# Altium PCB ZYNQ_BOARD.PcbDoc (part 3 of 9)
Units mm, origin at the board's own origin, x right, y up, seen from the top; angles counter-clockwise.
Board outline 120 x 66 mm, 10 copper layers (Top Layer, Internal Plane 1 (GND), Middle Layer 1, Middle Layer 2, Internal Plane 2 (+1.0V), Middle Layer 3, Middle Layer 4, Middle Layer 5 (PWR), Internal Plane 3 (GND), Bottom Layer), stack 0.982 mm thick; 333 components, 331 nets, 1511 pads, 1077 vias.
Unrouted connection lines stored in the file: 30.
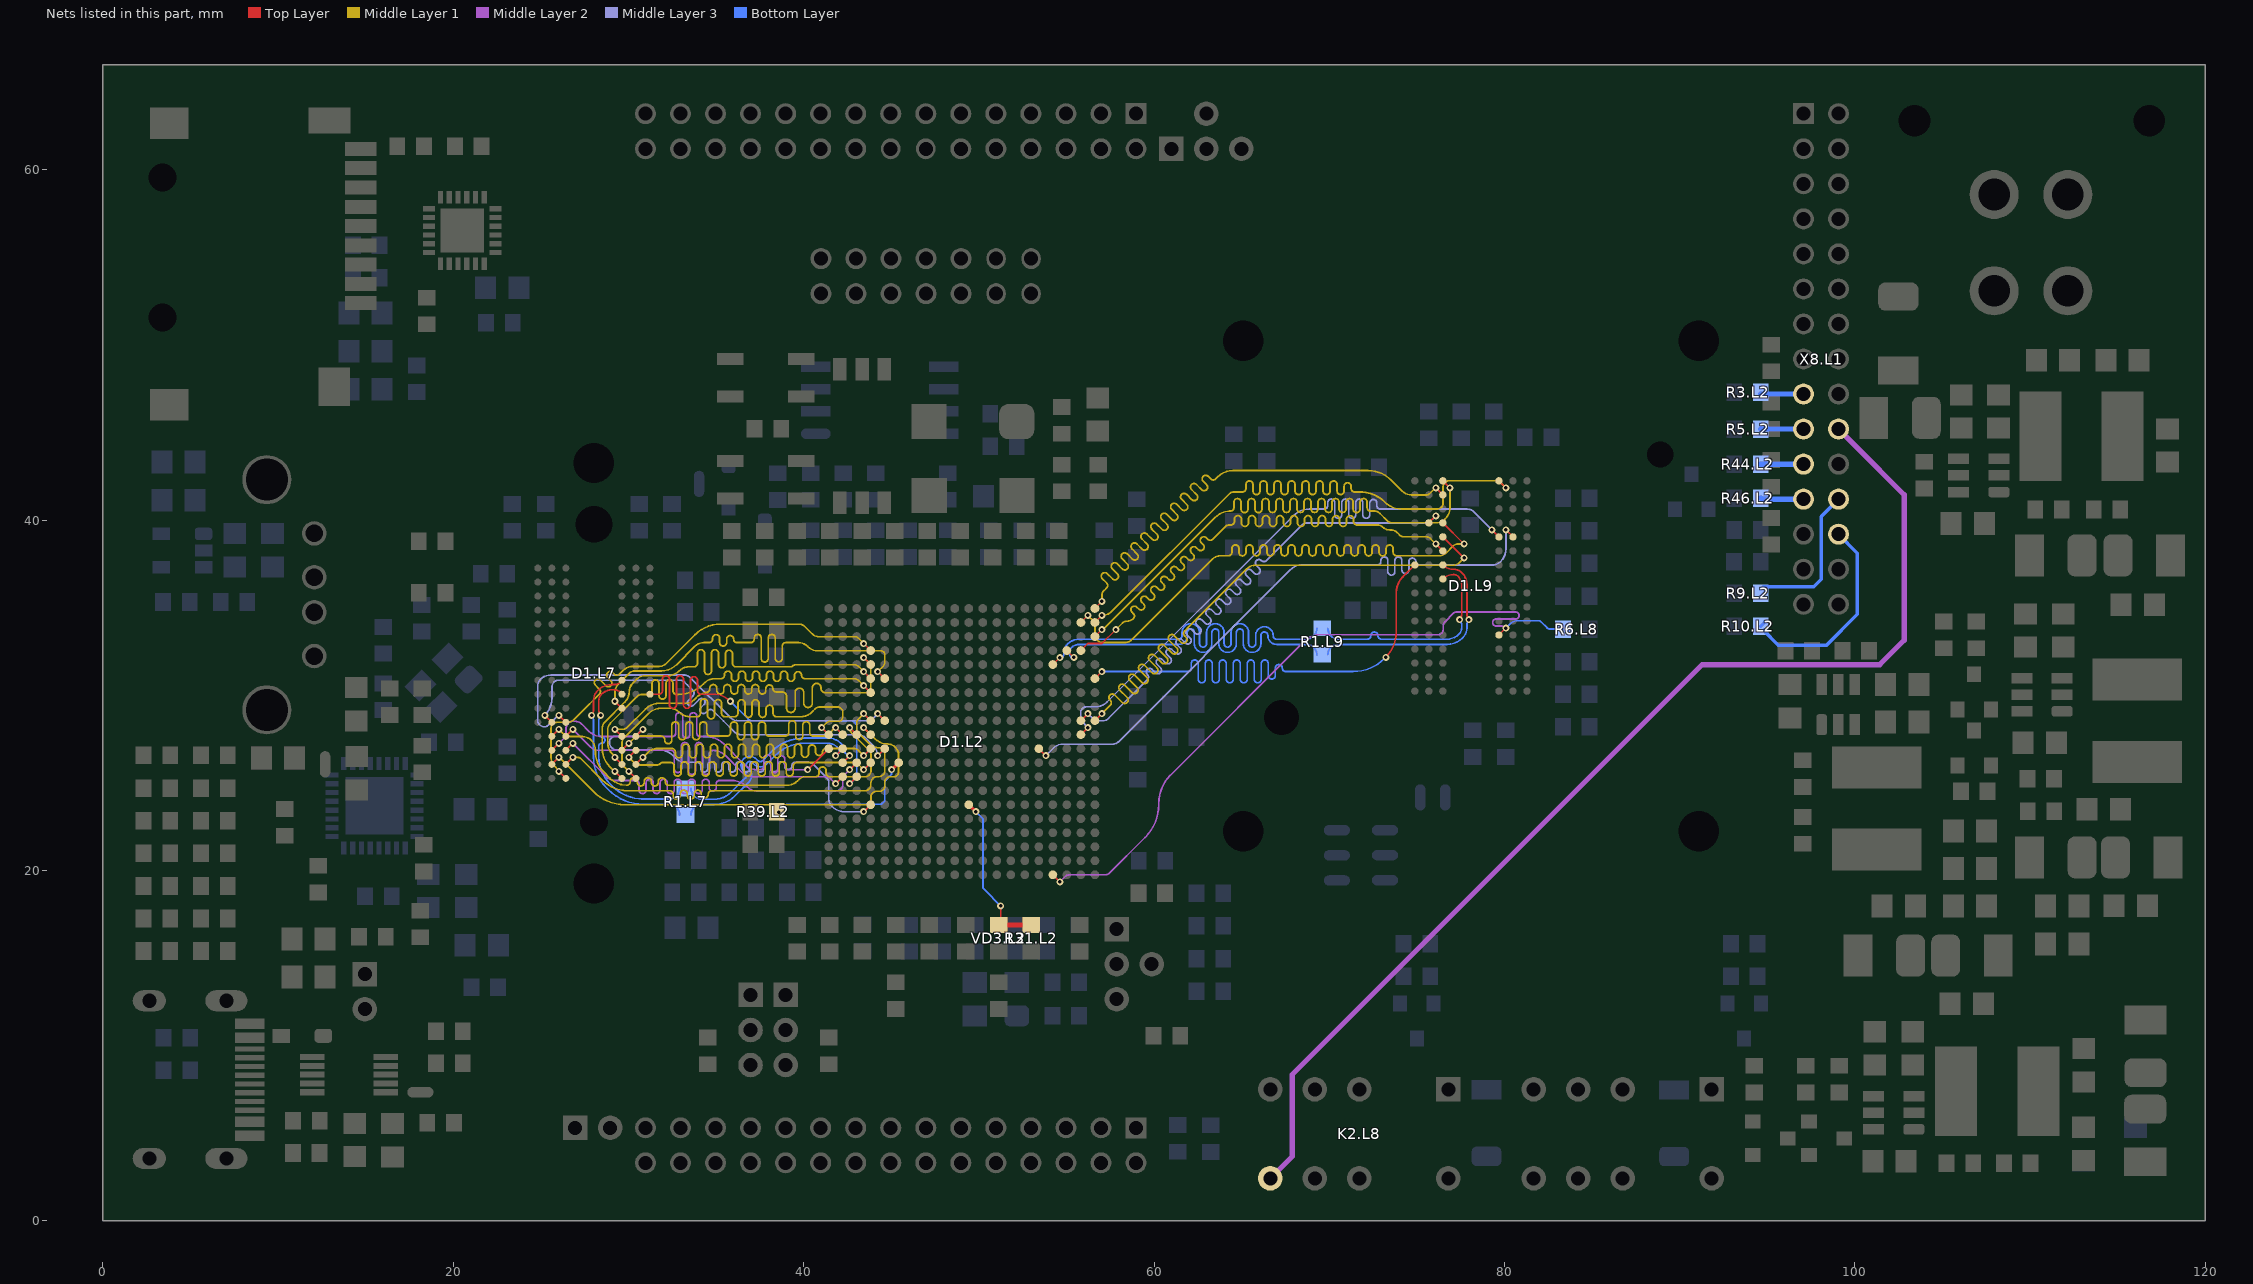
[diagram p11: the nets of this part, all layers, seen from the top]

## Via types
v1: diameter 0.4, hole 0.2, Top Layer to Bottom Layer, 1059 vias
v2: diameter 0.9, hole 0.6, Top Layer to Bottom Layer, 18 vias

## Nets (pads, with @x,y where several pads share a name; then routed paths per layer and width w, separated by ;. In a path a pad name is that pad's centre, name@x,y a point inside that pad or via, vN(x,y) a via of type N, cw(c..) or ccw(c..) an arc to the next point about the centre after c; other vN are vias at no path point) (continued)
A10: D1.L2.D19 D1.L9.L7 | length 38
  Top Layer w0.1: D1.L2.D19@55.82,32.56 56.22,32.96 57.02,32.96 v1(57.82,33.76) ; v1(76.08,38.645) D1.L9.L7@76.48,38.245
  Middle Layer 1 w0.1: v1(57.82,33.76) 58.193,34.133 cw(c58.445,33.881) 58.445,34.237 58.464,34.237 ccw(c58.464,34.727) 58.78,34.353 ccw(c58.464,34.727) 58.811,34.381 58.817,34.387 ccw(c58.675,34.528) 58.817,34.67 58.734,34.752 cw(c58.876,34.894) 58.734,35.035 cw(c58.876,34.894) 59.017,35.035 59.122,34.931 ccw(c59.263,35.072) 59.404,34.931 ccw(c59.263,35.072) 59.404,35.214 59.3,35.318 cw(c59.441,35.459) 59.3,35.601 cw(c59.441,35.459) 59.583,35.601 59.687,35.496 ccw(c59.829,35.638) 59.97,35.496 ccw(c59.829,35.638) 59.97,35.779 59.866,35.884 cw(c60.007,36.025) 59.866,36.167 cw(c60.007,36.025) 60.149,36.167 60.253,36.062 ccw(c60.394,36.204) 60.536,36.062 ccw(c60.394,36.204) 60.536,36.345 60.431,36.449 cw(c60.573,36.591) 60.431,36.732 cw(c60.573,36.591) 60.714,36.732 60.819,36.628 ccw(c60.96,36.769) 61.101,36.628 ccw(c60.96,36.769) 61.101,36.911 60.997,37.015 cw(c61.139,37.156) 60.997,37.298 cw(c61.139,37.156) 61.28,37.298 61.384,37.194 ccw(c61.526,37.335) 61.667,37.194 ccw(c61.526,37.335) 61.667,37.476 61.563,37.581 cw(c61.704,37.722) 61.563,37.864 cw(c61.704,37.722) 61.846,37.864 61.95,37.759 ccw(c62.091,37.901) 62.233,37.759 ccw(c62.091,37.901) 62.233,38.042 62.128,38.146 cw(c62.27,38.288) 62.128,38.429 cw(c62.27,38.288) 62.411,38.429 62.516,38.325 ccw(c62.657,38.466) 62.799,38.325 ccw(c62.657,38.466) 62.799,38.608 62.694,38.712 cw(c62.836,38.854) 62.694,38.995 cw(c62.836,38.854) 62.977,38.995 63.059,38.913 ccw(c63.201,39.054) 63.342,38.913 63.825,39.395 64.078,39.649 cw(c64.275,39.452) 64.188,39.716 cw(c64.275,39.452) 64.275,39.73 64.332,39.73 64.382,39.73 ccw(c64.382,39.93) 64.582,39.93 64.582,40.063 cw(c64.782,40.063) 64.982,40.063 64.982,39.844 ccw(c65.182,39.844) 65.382,39.844 65.382,40.063 cw(c65.582,40.063) 65.782,40.063 65.782,39.844 ccw(c65.982,39.844) 66.182,39.844 66.182,40.063 cw(c66.382,40.063) 66.582,40.063 66.582,39.844 ccw(c66.782,39.844) 66.982,39.844 66.982,40.063 cw(c67.182,40.063) 67.382,40.063 67.382,39.844 ccw(c67.582,39.844) 67.782,39.844 67.782,40.063 cw(c67.982,40.063) 68.182,40.063 68.182,39.844 ccw(c68.382,39.844) 68.582,39.844 68.582,40.063 cw(c68.782,40.063) 68.982,40.063 68.982,39.844 ccw(c69.182,39.844) 69.382,39.844 69.382,40.063 cw(c69.582,40.063) 69.782,40.063 69.782,39.844 ccw(c69.982,39.844) 70.182,39.844 70.182,40.063 cw(c70.382,40.063) 70.582,40.063 70.582,39.844 ccw(c70.782,39.844) 70.982,39.844 70.982,40.059 cw(c71.182,40.059) 71.382,40.059 71.382,39.93 ccw(c71.582,39.93) 71.582,39.73 72.123,39.73 72.753,39.73 cw(c72.753,39.324) 73.04,39.611 ccw(c73.441,40.012) 73.441,39.445 73.508,39.445 cw(c73.508,38.938) 73.866,39.296 74.004,39.159 ccw(c74.265,39.421) 74.265,39.051 75.535,39.051 cw(c75.535,38.719) 75.77,38.953 v1(76.08,38.645) v1(76.08,38.645) v1@76.117,38.682
A11: D1.L2.A20 D1.L9.R7 | length 37.9
  Top Layer w0.1: D1.L2.A20@56.62,34.96 v1(57.02,35.36) ; v1(76.08,41.845) D1.L9.R7@76.48,41.445
  Middle Layer 1 w0.1: v1(57.02,35.36) 57.02,35.742 cw(c57.308,35.742) 57.104,35.946 57.255,36.097 57.29,36.132 ccw(c57.149,36.273) 57.29,36.415 57.042,36.663 cw(c57.183,36.805) 57.042,36.946 cw(c57.183,36.805) 57.325,36.946 57.62,36.651 ccw(c57.761,36.792) 57.903,36.651 ccw(c57.761,36.792) 57.903,36.934 57.608,37.229 cw(c57.749,37.37) 57.608,37.512 cw(c57.749,37.37) 57.891,37.512 58.186,37.216 ccw(c58.327,37.358) 58.469,37.216 ccw(c58.327,37.358) 58.469,37.499 58.173,37.794 cw(c58.315,37.936) 58.173,38.077 cw(c58.315,37.936) 58.456,38.077 58.751,37.782 ccw(c58.893,37.923) 59.034,37.782 ccw(c58.893,37.923) 59.034,38.065 58.739,38.36 cw(c58.88,38.502) 58.739,38.643 cw(c58.88,38.502) 59.022,38.643 59.317,38.348 ccw(c59.459,38.489) 59.6,38.348 ccw(c59.459,38.489) 59.6,38.631 59.305,38.926 cw(c59.446,39.067) 59.305,39.209 cw(c59.446,39.067) 59.588,39.209 59.883,38.913 ccw(c60.024,39.055) 60.166,38.913 ccw(c60.024,39.055) 60.166,39.196 59.87,39.492 cw(c60.012,39.633) 59.87,39.774 cw(c60.012,39.633) 60.153,39.774 60.449,39.479 ccw(c60.59,39.621) 60.731,39.479 ccw(c60.59,39.621) 60.731,39.762 60.436,40.057 cw(c60.578,40.199) 60.436,40.34 cw(c60.578,40.199) 60.719,40.34 61.014,40.045 ccw(c61.156,40.186) 61.297,40.045 ccw(c61.156,40.186) 61.297,40.328 61.002,40.623 cw(c61.143,40.764) 61.002,40.906 cw(c61.143,40.764) 61.285,40.906 61.58,40.61 ccw(c61.721,40.752) 61.863,40.61 ccw(c61.721,40.752) 61.863,40.893 61.567,41.189 cw(c61.709,41.33) 61.567,41.471 cw(c61.709,41.33) 61.85,41.471 62.146,41.176 ccw(c62.287,41.318) 62.428,41.176 ccw(c62.287,41.318) 62.428,41.459 62.133,41.754 cw(c62.275,41.896) 62.133,42.037 cw(c62.275,41.896) 62.416,42.037 62.711,41.742 ccw(c62.853,41.883) 62.994,41.742 ccw(c62.853,41.883) 62.994,42.025 62.801,42.218 cw(c62.942,42.359) 62.801,42.501 cw(c62.942,42.359) 63.084,42.501 63.23,42.354 ccw(c63.371,42.496) 63.513,42.354 63.633,42.475 63.75,42.577 cw(c64.491,41.616) 63.79,42.607 cw(c64.491,41.616) 64.491,42.83 72.223,42.83 ; 72.224,42.83 cw(c72.224,40.981) 73.531,42.289 73.532,42.288 74.171,41.649 ; 74.171,41.649 ccw(c74.679,42.157) 74.679,41.439 75.537,41.439 ccw(c75.537,41.698) 75.72,41.515 76.029,41.824 cw(c76.08,41.773) v1(76.08,41.845)
A12: D1.L2.B19 D1.L9.N7 | length 37.9
  Top Layer w0.1: D1.L2.B19@55.82,34.16 v1(56.22,34.56) ; D1.L9.N7@76.48,39.845 v1@77.685,38.64
  Middle Layer 1 w0.1: v1(56.22,34.56) 56.543,34.237 cw(c56.338,34.033) 56.627,34.033 56.627,33.697 ; 56.627,33.696 56.627,33.397 ccw(c56.947,33.397) 56.721,33.171 ccw(c57.103,33.554) 57.103,33.013 58.298,33.013 ccw(c58.298,33.652) 58.75,33.2 63.346,37.796 cw(c63.761,37.382) 63.761,37.968 64.19,37.968 64.24,37.968 ccw(c64.24,38.168) 64.44,38.168 64.44,38.385 cw(c64.64,38.385) 64.84,38.385 64.84,38.162 ccw(c65.04,38.162) 65.24,38.162 65.24,38.385 cw(c65.44,38.385) 65.64,38.385 65.64,38.162 ccw(c65.84,38.162) 66.04,38.162 66.04,38.385 cw(c66.24,38.385) 66.44,38.385 66.44,38.162 ccw(c66.64,38.162) 66.84,38.162 66.84,38.385 cw(c67.04,38.385) 67.24,38.385 67.24,38.162 ccw(c67.44,38.162) 67.64,38.162 67.64,38.385 cw(c67.84,38.385) 68.04,38.385 68.04,38.162 ccw(c68.24,38.162) 68.44,38.162 68.44,38.385 cw(c68.64,38.385) 68.84,38.385 68.84,38.162 ccw(c69.04,38.162) 69.24,38.162 69.24,38.385 cw(c69.44,38.385) 69.64,38.385 69.64,38.162 ccw(c69.84,38.162) 70.04,38.162 70.04,38.385 cw(c70.24,38.385) 70.44,38.385 70.44,38.162 ccw(c70.64,38.162) 70.84,38.162 70.84,38.385 cw(c71.04,38.385) 71.24,38.385 71.24,38.162 ccw(c71.44,38.162) 71.64,38.162 71.64,38.385 cw(c71.84,38.385) 72.04,38.385 72.04,38.162 ccw(c72.24,38.162) 72.44,38.162 72.44,38.385 cw(c72.64,38.385) 72.84,38.385 72.84,38.162 ccw(c73.04,38.162) 73.24,38.162 73.24,38.385 cw(c73.44,38.385) 73.64,38.385 73.64,38.168 ccw(c73.84,38.168) 73.84,37.968 75.199,37.968 76.282,37.968 ccw(c76.282,38.499) 76.658,38.124 77.065,38.531 cw(c77.34,38.256) 77.34,38.645 v1(77.69,38.645)
A13: D1.L2.B20 D1.L9.T3 | length 37.9
  Top Layer w0.1: D1.L2.B20@56.62,34.16 v1(57.02,34.56) ; D1.L9.T3@79.68,42.245 v1(80.08,41.845)
  Middle Layer 1 w0.1: v1(57.02,34.56) ccw(c57.02,35.354) 57.582,34.793 64.304,41.515 cw(c64.532,41.286) 64.532,41.609 64.992,41.609 65.042,41.609 ccw(c65.042,41.809) 65.242,41.809 65.242,42.037 cw(c65.442,42.037) 65.642,42.037 65.642,41.664 ccw(c65.842,41.664) 66.042,41.664 66.042,42.037 cw(c66.242,42.037) 66.442,42.037 66.442,41.664 ccw(c66.642,41.664) 66.842,41.664 66.842,42.037 cw(c67.042,42.037) 67.242,42.037 67.242,41.664 ccw(c67.442,41.664) 67.642,41.664 67.642,42.037 cw(c67.842,42.037) 68.042,42.037 68.042,41.664 ccw(c68.242,41.664) 68.442,41.664 68.442,42.037 cw(c68.642,42.037) 68.842,42.037 68.842,41.664 ccw(c69.042,41.664) 69.242,41.664 69.242,42.037 cw(c69.442,42.037) 69.642,42.037 69.642,41.664 ccw(c69.842,41.664) 70.042,41.664 70.042,42.037 cw(c70.242,42.037) 70.442,42.037 70.442,41.664 ccw(c70.642,41.664) 70.842,41.664 70.842,41.935 cw(c71.042,41.935) 71.242,41.935 71.242,41.809 ccw(c71.442,41.809) 71.442,41.609 71.757,41.609 71.84,41.608 cw(c71.757,39.597) 71.89,41.605 cw(c71.757,39.597) 72.099,41.58 cw(c71.757,39.597) 73.18,41.02 ccw(c74.097,41.937) 74.097,40.64 76.163,40.64 ccw(c76.163,40.985) 76.406,40.741 ccw(c76.206,40.941) 76.489,40.941 76.489,41.882 cw(c76.868,41.882) 76.6,42.15 cw(c76.841,41.909) 76.841,42.25 79.448,42.25 cw(c79.448,41.702) 79.836,42.089 v1(80.08,41.845)
A14: D1.L2.C20 D1.L9.T7 | length 38
  Top Layer w0.1: D1.L2.C20@56.62,33.36 v1(57.02,33.76) ; D1.L9.T7@76.48,42.245 v1(76.88,41.845)
  Middle Layer 1 w0.1: v1@57.02,33.7 63.468,40.148 cw(c64.37,39.246) 64.199,40.51 cw(c64.37,39.246) 64.305,40.52 cw(c64.37,39.246) 64.355,40.522 ; v1(57.02,33.76) v1@57.079,33.76 ; 64.356,40.522 ccw(c64.355,40.722) 64.555,40.722 64.555,41.034 cw(c64.755,41.034) 64.955,41.034 64.955,40.631 ccw(c65.155,40.631) 65.355,40.631 65.355,41.034 cw(c65.555,41.034) 65.755,41.034 65.755,40.636 ccw(c65.955,40.636) 66.155,40.636 66.155,41.034 cw(c66.355,41.034) 66.555,41.034 66.555,40.641 ccw(c66.755,40.641) 66.955,40.641 66.955,41.034 cw(c67.155,41.034) 67.355,41.034 67.355,40.641 ccw(c67.555,40.641) 67.755,40.641 67.755,41.034 cw(c67.955,41.034) 68.155,41.034 68.155,40.641 ccw(c68.355,40.641) 68.555,40.641 68.555,41.034 cw(c68.755,41.034) 68.955,41.034 68.955,40.641 ccw(c69.155,40.641) 69.355,40.641 69.355,41.034 cw(c69.555,41.034) 69.755,41.034 69.755,40.641 ccw(c69.955,40.641) 70.155,40.641 70.155,41.034 cw(c70.355,41.034) 70.555,41.034 70.555,40.641 ccw(c70.755,40.641) 70.955,40.641 70.955,41.034 cw(c71.155,41.034) 71.355,41.034 71.355,40.638 ccw(c71.555,40.638) 71.755,40.638 71.755,41.034 cw(c71.955,41.034) 72.155,41.034 72.155,40.722 ccw(c72.355,40.722) 72.355,40.522 72.557,40.522 72.578,40.521 cw(c72.557,40.048) 72.622,40.517 cw(c72.557,40.048) 72.628,40.516 cw(c72.557,40.048) 72.64,40.514 cw(c72.557,40.048) 72.892,40.383 72.893,40.382 73.314,39.961 ccw(c73.582,40.229) 73.582,39.85 76.08,39.85 ccw(c76.08,40.595) 76.607,40.068 76.63,40.091 ccw(c76.026,40.695) 76.88,40.695 v1(76.88,41.845)
A15: D1.L2.J20 D1.L9.M7 | length 38
  Top Layer w0.1: D1.L2.J20@56.62,28.56 v1(57.02,28.96) ; D1.L9.M7@76.48,39.045 v1@77.723,37.803
  Middle Layer 1 w0.1: v1(57.02,28.96) 57.458,29.398 57.494,29.434 ccw(c57.352,29.575) 57.494,29.717 57.472,29.738 cw(c57.614,29.879) 57.472,30.021 cw(c57.614,29.879) 57.755,30.021 58.181,29.595 ccw(c58.323,29.736) 58.464,29.595 ccw(c58.323,29.736) 58.464,29.877 58.038,30.303 cw(c58.18,30.445) 58.038,30.586 cw(c58.18,30.445) 58.321,30.586 58.747,30.16 ccw(c58.888,30.302) 59.03,30.16 ccw(c58.888,30.302) 59.03,30.443 58.604,30.869 cw(c58.745,31.011) 58.604,31.152 cw(c58.745,31.011) 58.887,31.152 59.313,30.726 ccw(c59.454,30.867) 59.596,30.726 ccw(c59.454,30.867) 59.596,31.009 59.17,31.435 cw(c59.311,31.576) 59.17,31.718 cw(c59.311,31.576) 59.452,31.718 59.878,31.292 ccw(c60.02,31.433) 60.161,31.292 ccw(c60.02,31.433) 60.161,31.574 59.735,32 cw(c59.877,32.142) 59.735,32.283 cw(c59.877,32.142) 60.018,32.283 60.444,31.857 ccw(c60.585,31.999) 60.727,31.857 ccw(c60.585,31.999) 60.727,32.14 60.301,32.566 cw(c60.442,32.708) 60.301,32.849 cw(c60.442,32.708) 60.584,32.849 61.01,32.423 ccw(c61.151,32.564) 61.293,32.423 ccw(c61.151,32.564) 61.293,32.706 60.867,33.132 cw(c61.008,33.273) 60.867,33.415 cw(c61.008,33.273) 61.149,33.415 61.534,33.03 ccw(c61.676,33.171) 61.817,33.03 ccw(c61.676,33.171) 61.817,33.313 61.736,33.393 cw(c61.878,33.535) 61.736,33.676 62,33.94 65.283,37.223 cw(c65.78,36.727) 65.78,37.429 77.072,37.429 ccw(c77.072,37.918) 77.417,37.572 v1(77.69,37.845)
ADDR0: D1.L2.N2 D1.L7.N3 | length 26.2
  Top Layer w0.1: D1.L7.N3@26.42,27.665 v1(26.82,28.065) ; v1(41.82,24.96) D1.L2.N2@42.22,25.36
  Middle Layer 1 w0.1: v1(26.82,28.065) v1@26.881,28.065
  Middle Layer 2 w0.1: v1(26.82,28.065) 27.838,27.047 27.839,27.046 ccw(c28.279,27.487) 28.279,26.864 ; 28.28,26.864 32.08,26.864 32.415,26.864 cw(c32.415,26.664) 32.615,26.664 32.615,25.793 ccw(c32.815,25.793) 33.015,25.793 33.015,27.108 cw(c33.215,27.108) 33.415,27.108 33.415,25.683 ccw(c33.615,25.683) 33.815,25.683 33.815,27.108 cw(c34.015,27.108) 34.215,27.108 34.215,25.683 ccw(c34.415,25.683) 34.615,25.683 34.615,26.662 cw(c34.815,26.662) 34.827,26.862 34.915,26.856 cw(c34.789,25.803) 34.922,26.855 cw(c34.789,25.803) 34.965,26.849 cw(c34.789,25.803) 35.539,26.553 35.54,26.552 36.476,25.616 ccw(c37.119,26.259) 37.119,25.35 41.251,25.35 cw(c41.251,24.917) 41.557,25.223 v1(41.82,24.96)
ADDR1: D1.L2.K2 D1.L7.P7 | length 26.4
  Top Layer w0.1: D1.L7.P7@29.62,26.865 v1(30.02,27.265) ; v1(41.82,28.16) D1.L2.K2@42.22,27.76
  Middle Layer 1 w0.1: v1(30.02,27.265) 30.266,27.511 cw(c30.665,27.114) 30.665,27.677 31.415,27.677 31.865,27.677 cw(c31.865,27.477) 32.065,27.477 32.065,27.443 ccw(c32.265,27.443) 32.465,27.443 32.465,28.287 cw(c32.665,28.287) 32.865,28.287 32.865,27.67 ccw(c33.065,27.67) 33.265,27.67 33.265,28.287 cw(c33.465,28.287) 33.665,28.287 33.665,27.67 ccw(c33.865,27.67) 34.065,27.67 34.065,28.287 cw(c34.265,28.287) 34.465,28.287 34.465,27.877 ccw(c34.665,27.877) 34.665,27.677 34.932,27.677 35.568,27.677 35.618,27.677 ccw(c35.618,27.877) 35.818,27.877 35.818,28.287 cw(c36.018,28.287) 36.218,28.287 36.218,27.663 ccw(c36.418,27.663) 36.618,27.663 36.618,28.287 cw(c36.818,28.287) 37.018,28.287 37.018,27.663 ccw(c37.218,27.663) 37.418,27.663 37.418,28.287 cw(c37.618,28.287) 37.818,28.287 37.818,27.877 ccw(c38.018,27.877) 38.018,27.677 38.47,27.677 38.891,27.677 38.941,27.677 ccw(c38.941,27.877) 39.141,27.877 39.141,28.357 cw(c39.341,28.357) 39.541,28.357 39.541,27.672 ccw(c39.741,27.672) 39.941,27.672 39.941,28.301 cw(c40.141,28.301) 40.341,28.301 40.341,27.877 ccw(c40.541,27.877) 40.541,27.677 40.848,27.677 41.111,27.677 ccw(c41.111,28.161) 41.453,27.819 41.776,28.142 cw(c41.82,28.097) v1(41.82,28.16)
ADDR2: D1.L2.M3 D1.L7.P3 | length 26.2
  Top Layer w0.1: D1.L7.P3@26.42,26.865 v1(26.82,27.265) ; v1(42.62,25.76) D1.L2.M3@43.02,26.16
  Middle Layer 1 w0.1: v1(26.82,27.265) v1@26.893,27.265
  Middle Layer 2 w0.1: v1(26.82,27.265) 28.739,25.346 ccw(c29.22,25.827) 29.22,25.147 29.952,25.147 30.002,25.147 30.402,25.147 cw(c30.402,24.947) 30.602,24.947 30.602,24.595 ccw(c30.802,24.595) 31.002,24.595 31.002,25.013 cw(c31.202,25.013) 31.402,25.013 31.402,24.595 ccw(c31.602,24.595) 31.802,24.595 31.802,25.013 cw(c32.002,25.013) 32.202,25.013 32.202,24.595 ccw(c32.402,24.595) 32.602,24.595 32.602,25.013 cw(c32.802,25.013) 33.002,25.013 33.002,24.595 ccw(c33.202,24.595) 33.402,24.595 33.402,25.013 cw(c33.602,25.013) 33.802,25.013 33.802,24.595 ccw(c34.002,24.595) 34.202,24.595 34.202,25.013 cw(c34.402,25.013) 34.602,25.013 34.602,24.731 ccw(c34.802,24.731) 35.002,24.731 35.002,24.947 cw(c35.202,24.947) 35.202,25.147 35.545,25.147 35.595,25.147 35.857,25.147 cw(c35.857,23.817) 36.025,25.136 cw(c35.857,23.817) 36.797,24.758 cw(c35.857,23.817) 36.798,24.757 ccw(c37.303,25.263) 37.303,24.548 ; 37.304,24.548 41.858,24.548 ccw(c41.858,24.945) 42.138,24.663 ccw(c41.929,24.875) 42.226,24.875 42.226,25.147 cw(c42.757,25.147) 42.382,25.522 v1(42.62,25.76)
ADDR3: D1.L2.K3 D1.L7.N2 | length 26.4
  Top Layer w0.1: D1.L7.N2@25.62,27.665 v1(26.02,28.065) ; v1(42.62,28.16) D1.L2.K3@43.02,27.76
  Middle Layer 1 w0.1: v1(26.02,28.065) 26.269,27.816 ccw(c26.67,28.217) 26.67,27.65 27.366,27.65 cw(c27.366,26.942) 27.867,27.443 cw(c27.275,26.851) 28.112,26.851 28.112,26.694 ccw(c29.717,26.77) 28.581,25.633 28.935,25.28 ccw(c29.936,26.281) 29.546,24.92 ccw(c29.936,26.281) 29.596,24.906 29.873,24.873 ccw(c29.898,25.071) 30.098,25.071 30.098,25.095 cw(c30.298,25.095) 30.498,25.095 30.498,25.031 ccw(c30.698,25.031) 30.898,25.031 30.898,25.095 cw(c31.098,25.095) 31.298,25.095 31.298,25.031 ccw(c31.498,25.031) 31.698,25.031 31.698,25.095 cw(c31.898,25.095) 32.098,25.095 32.098,25.065 ccw(c32.298,25.065) 32.298,24.865 32.748,24.865 39.039,24.865 ccw(c39.039,25.723) 39.645,25.116 39.746,25.217 cw(c40.083,24.881) 40.083,25.357 40.625,25.357 40.675,25.357 ccw(c40.675,25.557) 40.875,25.557 40.875,25.716 cw(c41.075,25.716) 41.275,25.716 41.275,25.557 ccw(c41.475,25.557) 41.475,25.357 42.171,25.357 43.496,25.357 ccw(c43.496,25.69) 43.73,25.453 ccw(c43.465,25.72) 43.841,25.72 43.841,26.625 ccw(c43.53,26.625) 43.75,26.845 42.751,27.844 cw(c43.067,28.16) v1(42.62,28.16)
ADDR4: D1.L2.M4 D1.L7.P8 | length 26.4
  Top Layer w0.1: v1(30.02,26.465) D1.L7.P8@30.42,26.865 ; v1(43.42,25.76) D1.L2.M4@43.82,26.16
  Middle Layer 1 w0.1: v1(30.02,26.465) 30.381,26.104 ccw(c30.565,26.288) 30.565,26.028 31.62,26.028 ccw(c31.62,26.287) 31.803,26.104 cw(c31.963,25.944) 31.95,26.169 cw(c31.963,25.944) 31.963,26.17 32.4,26.17 cw(c32.4,25.97) 32.6,25.97 32.6,25.592 ccw(c32.8,25.592) 33,25.592 33,26.009 cw(c33.2,26.009) 33.4,26.009 33.4,25.592 ccw(c33.6,25.592) 33.8,25.592 33.8,26.009 cw(c34,26.009) 34.2,26.009 34.2,25.592 ccw(c34.4,25.592) 34.6,25.592 34.6,26.009 cw(c34.8,26.009) 35,26.009 35,25.592 ccw(c35.2,25.592) 35.4,25.592 35.4,26.009 cw(c35.6,26.009) 35.8,26.009 35.8,25.592 ccw(c36,25.592) 36.2,25.592 36.2,26.009 cw(c36.4,26.009) 36.6,26.009 36.6,25.592 ccw(c36.8,25.592) 37,25.592 37,26.009 cw(c37.2,26.009) 37.4,26.009 37.4,25.592 ccw(c37.6,25.592) 37.8,25.592 37.8,26.009 cw(c38,26.009) 38.2,26.009 38.2,25.592 ccw(c38.4,25.592) 38.6,25.592 38.6,26.009 cw(c38.8,26.009) 39,26.009 39,25.592 ccw(c39.2,25.592) 39.4,25.592 39.4,25.97 cw(c39.6,25.97) 39.6,26.17 40.157,26.17 42.849,26.17 cw(c42.849,25.779) 43.125,26.055 v1(43.42,25.76)
ADDR5: D1.L2.L1 D1.L7.P2 | length 26.1
  Top Layer w0.1: D1.L7.P2@25.62,26.865 v1(26.02,27.265) ; v1(40.22,25.76) D1.L2.L1@41.42,26.96
  Middle Layer 2 w0.1: v1(26.02,27.265) 26.267,27.512 ccw(c25.874,27.905) 26.43,27.905 26.43,28.09 ; 26.43,28.091 cw(c26.888,28.091) 26.565,28.416 cw(c26.818,28.161) 26.818,28.52 26.943,28.52 cw(c26.943,27.989) 27.318,28.365 27.319,28.364 27.721,27.962 ccw(c28.474,28.714) 28.474,27.65 32.445,27.65 32.495,27.65 ccw(c32.495,27.85) 32.695,27.85 32.695,28.808 cw(c32.895,28.808) 33.095,28.808 33.095,27.761 ccw(c33.295,27.761) 33.495,27.761 33.495,28.808 cw(c33.695,28.808) 33.895,28.808 33.895,27.85 ccw(c34.095,27.85) 34.095,27.65 34.38,27.65 34.488,27.646 cw(c34.38,26.12) 34.538,27.642 cw(c34.38,26.12) 34.789,27.594 cw(c34.38,26.12) 34.925,27.55 cw(c34.38,26.12) 35.461,27.202 36.578,26.085 36.579,26.085 ccw(c37.362,26.868) 37.362,25.76 37.472,25.76 37.522,25.76 ccw(c37.522,25.96) 37.722,25.96 37.722,26.408 cw(c37.922,26.408) 38.122,26.408 38.122,25.785 ccw(c38.322,25.785) 38.522,25.785 38.522,26.35 cw(c38.722,26.35) 38.922,26.35 38.922,25.96 ccw(c39.122,25.96) 39.122,25.76 39.477,25.76 v1(40.22,25.76)
ADDR6: D1.L2.L4 D1.L7.R8 | length 26.4
  Top Layer w0.1: D1.L7.R8@30.42,26.065 v1(30.82,26.465) ; v1(43.42,26.56) D1.L2.L4@43.82,26.96
  Middle Layer 1 w0.1: v1(30.82,26.465) 30.839,26.465 31.181,26.807 cw(c31.575,26.413) 31.223,26.844 cw(c31.575,26.413) 31.273,26.881 31.575,26.97 32.473,26.97 cw(c32.473,26.77) 32.673,26.77 32.673,26.639 ccw(c32.873,26.639) 33.073,26.639 33.073,27.014 cw(c33.273,27.014) 33.473,27.014 33.473,26.639 ccw(c33.673,26.639) 33.873,26.639 33.873,27.014 cw(c34.073,27.014) 34.273,27.014 34.273,26.639 ccw(c34.473,26.639) 34.673,26.639 34.673,27.014 cw(c34.873,27.014) 35.073,27.014 35.073,26.639 ccw(c35.273,26.639) 35.473,26.639 35.473,27.014 cw(c35.673,27.014) 35.873,27.014 35.873,26.639 ccw(c36.073,26.639) 36.273,26.639 36.273,27.014 cw(c36.473,27.014) 36.673,27.014 36.673,26.639 ccw(c36.873,26.639) 37.073,26.639 37.073,27.014 cw(c37.273,27.014) 37.473,27.014 37.473,26.639 ccw(c37.673,26.639) 37.873,26.639 37.873,27.014 cw(c38.073,27.014) 38.273,27.014 38.273,26.639 ccw(c38.473,26.639) 38.673,26.639 38.673,27.014 cw(c38.873,27.014) 39.073,27.014 39.073,26.639 ccw(c39.273,26.639) 39.473,26.639 39.473,27.014 cw(c39.673,27.014) 39.873,27.014 39.873,26.667 ccw(c40.073,26.667) 40.273,26.667 40.273,26.97 cw(c40.473,26.97) 40.673,26.97 40.673,26.77 ccw(c40.873,26.77) 41.073,26.77 cw(c41.273,26.77) 41.273,26.97 42.025,26.97 42.821,26.97 cw(c42.821,26.514) 43.144,26.836 v1(43.42,26.56)
ADDR7: D1.L2.K4 D1.L7.R2 | length 26.4
  Top Layer w0.1: D1.L7.R2@25.62,26.065 v1(26.02,26.465) ; v1(43.42,28.16) D1.L2.K4@43.82,27.76
  Middle Layer 1 w0.1: v1(26.02,26.465) 26.042,26.465 28.009,24.497 ccw(c29.789,26.277) 29.789,23.76 31.182,23.76 ; 31.183,23.76 43.514,23.76 ccw(c43.514,24.136) 43.78,23.87 ccw(c43.632,24.018) 43.841,24.018 43.841,24.261 cw(c44.059,24.261) 43.905,24.416 43.913,24.424 cw(c44.17,24.167) 44.17,24.53 44.345,24.53 ccw(c44.345,24.795) 44.531,24.607 ccw(c44.296,24.844) 44.63,24.844 44.63,25.066 cw(c44.89,25.066) 44.706,25.25 cw(c44.965,24.991) 44.965,25.357 45.151,25.357 ccw(c45.151,25.6) 45.324,25.428 ccw(c45.115,25.636) 45.41,25.636 45.41,26.625 ccw(c44.866,26.625) 45.251,27.009 45.203,27.057 ccw(c44.81,26.665) 44.81,27.22 cw(c44.81,28.306) 44.042,27.538 v1(43.42,28.16)
ADDR8: D1.L2.K1 D1.L7.T8 | length 26.5
  Top Layer w0.1: v1(30.02,25.665) D1.L7.T8@30.42,25.265 ; v1(41.02,28.16) D1.L2.K1@41.42,27.76
  Middle Layer 1 w0.1: v1(30.02,25.665) 29.697,25.988 cw(c29.878,26.17) 29.622,26.17 29.622,27.265 cw(c30.059,27.265) 29.75,27.575 31.132,28.957 cw(c31.864,28.225) 31.864,29.26 32.392,29.26 ; 32.393,29.26 cw(c32.393,28.594) 32.865,29.065 ; 32.866,29.064 ccw(c33.553,29.753) 33.553,28.78 33.858,28.78 33.908,28.78 ccw(c33.908,28.98) 34.108,28.98 34.108,29.598 cw(c34.308,29.598) 34.508,29.598 34.508,28.858 ccw(c34.708,28.858) 34.908,28.858 34.908,29.56 cw(c35.108,29.56) 35.308,29.56 35.308,28.98 ccw(c35.508,28.98) 35.508,28.78 35.786,28.78 35.996,28.78 36.046,28.78 ccw(c36.046,28.98) 36.246,28.98 36.246,29.553 cw(c36.446,29.553) 36.646,29.553 36.646,28.943 ccw(c36.846,28.943) 37.046,28.943 37.046,29.553 cw(c37.246,29.553) 37.446,29.553 37.446,28.943 ccw(c37.646,28.943) 37.846,28.943 37.846,29.246 cw(c38.046,29.246) 38.246,29.246 38.246,28.98 ccw(c38.446,28.98) 38.446,28.78 38.867,28.78 39.805,28.78 ccw(c39.805,29.733) 40.479,29.059 40.642,29.222 cw(c40.915,28.949) 40.915,29.335 41.939,29.335 cw(c41.939,29.079) 42.12,29.26 42.171,29.209 cw(c42.027,29.065) 42.231,29.065 42.231,28.797 cw(c41.925,28.797) 42.141,28.58 cw(c42.015,28.707) 42.015,28.527 41.545,28.527 ccw(c41.545,28.171) 41.293,28.423 41.03,28.16 v1(41.02,28.16)
ADDR9: D1.L2.J4 D1.L7.R3 | length 26.4
  Top Layer w0.1: D1.L7.R3@26.42,26.065 v1(26.82,26.465) ; v1(43.42,28.96) D1.L2.J4@43.82,28.56
  Middle Layer 1 w0.1: v1(26.82,26.465) 27.073,26.465 cw(c27.073,26.164) 27.286,26.377 28.504,25.159 ccw(c29.959,26.614) 29.959,24.556 30.115,24.556 ; 30.116,24.556 31.898,24.556 32.348,24.556 cw(c32.348,24.356) 32.548,24.356 32.548,24.283 ccw(c32.748,24.283) 32.948,24.283 32.948,24.395 cw(c33.148,24.395) 33.348,24.395 33.348,24.283 ccw(c33.548,24.283) 33.748,24.283 33.748,24.395 cw(c33.948,24.395) 34.148,24.395 34.148,24.344 ccw(c34.348,24.344) 34.548,24.344 34.548,24.356 cw(c34.748,24.356) 34.748,24.556 36.885,24.556 43.485,24.556 ccw(c43.485,24.902) 43.83,24.885 43.83,24.998 cw(c44.224,24.999) 43.946,25.278 cw(c44.136,25.087) 44.136,25.357 44.244,25.357 ccw(c44.244,25.786) 44.548,25.483 ccw(c44.35,25.681) 44.63,25.681 44.63,26.641 ; v1(43.42,28.96) 43.1,28.64 ccw(c43.28,28.46) 43.026,28.46 43.026,28.129 ccw(c43.429,28.129) 43.144,27.844 43.772,27.216 ccw(c44.267,27.711) 44.267,27.011 44.278,27.011 cw(c44.278,26.67) 44.518,26.912 44.518,26.911 cw(c44.249,26.642) 44.63,26.642
ADDR10: D1.L2.F5 D1.L7.L7 | length 26.5
  Top Layer w0.1: v1(29.22,29.665) D1.L7.L7@29.62,29.265 ; v1(44.22,31.36) D1.L2.F5@44.62,30.96
  Middle Layer 1 w0.1: v1(29.22,29.665) 29.22,30.14 cw(c29.953,30.14) 29.435,30.658 30.04,31.264 cw(c30.358,30.945) 30.358,31.396 31.877,31.396 ccw(c31.877,32.615) 32.74,31.753 33.781,32.794 cw(c34.308,32.267) 34.308,33.013 34.548,33.013 34.598,33.013 ccw(c34.598,33.213) 34.798,33.213 34.798,33.268 cw(c34.998,33.268) 35.198,33.268 35.198,33.013 ccw(c35.398,33.013) 35.598,33.013 35.598,33.213 cw(c35.798,33.213) 35.998,33.213 ccw(c36.198,33.213) 36.198,33.013 36.423,33.013 36.473,33.013 36.923,33.013 36.973,33.013 ccw(c36.973,33.213) 37.173,33.213 37.173,33.281 cw(c37.373,33.281) 37.573,33.281 37.573,32.102 ccw(c37.773,32.102) 37.973,32.102 37.973,33.281 cw(c38.173,33.281) 38.373,33.281 38.373,32.115 ccw(c38.573,32.115) 38.773,32.115 38.773,32.813 cw(c38.973,32.813) 38.973,33.013 39.28,33.013 39.693,33.013 cw(c39.693,32.267) 40.22,32.794 40.244,32.77 ccw(c40.79,33.316) 40.79,32.544 44.396,32.544 cw(c44.396,32.291) 44.576,32.47 cw(c44.444,32.339) 44.63,32.339 44.63,31.91 cw(c44.292,31.91) 44.531,31.671 v1(44.22,31.36)
ADDR11: D1.L2.G4 D1.L7.R7 | length 26.4
  Top Layer w0.1: v1(29.22,26.465) D1.L7.R7@29.62,26.065 ; v1(43.42,30.56) D1.L2.G4@43.82,30.16
  Middle Layer 1 w0.1: 28.81,27.839 28.81,27.265 ccw(c29.617,27.265) 29.046,26.694 29.181,26.559 cw(c29.086,26.465) v1(29.22,26.465) ; 28.81,27.84 28.81,28.036 cw(c29.357,28.036) 28.971,28.423 30.498,29.951 cw(c30.75,29.699) 30.75,30.055 31.087,30.055 31.137,30.055 ccw(c31.137,30.255) 31.337,30.255 31.337,30.679 cw(c31.537,30.679) 31.737,30.679 31.737,29.991 ccw(c31.937,29.991) 32.137,29.991 32.137,30.679 cw(c32.337,30.679) 32.537,30.679 32.537,30.255 ccw(c32.737,30.255) 32.737,30.055 32.827,30.055 33.014,30.063 ccw(c32.827,32.108) 33.064,30.069 ccw(c32.827,32.108) 34.279,30.657 34.356,30.733 cw(c34.879,30.209) 34.879,30.95 35.222,30.95 35.272,30.95 ccw(c35.272,31.15) 35.472,31.15 35.472,31.181 cw(c35.672,31.181) 35.872,31.181 35.872,31.003 ccw(c36.072,31.003) 36.272,31.003 36.272,31.181 cw(c36.472,31.181) 36.672,31.181 36.672,31.003 ccw(c36.872,31.003) 37.072,31.003 37.072,31.181 cw(c37.272,31.181) 37.472,31.181 37.472,31.003 ccw(c37.672,31.003) 37.872,31.003 37.872,31.181 cw(c38.072,31.181) 38.272,31.181 38.272,31.003 ccw(c38.472,31.003) 38.672,31.003 38.672,31.181 cw(c38.872,31.181) 39.072,31.181 39.072,31.003 ccw(c39.272,31.003) 39.472,31.003 39.472,31.155 cw(c39.672,31.155) 39.872,31.155 39.872,31.15 ccw(c40.072,31.15) 40.072,30.95 40.739,30.95 42.888,30.95 cw(c42.888,30.607) 43.13,30.85 v1(43.42,30.56)
ADDR12: D1.L2.E4 D1.L7.N7 | length 26.4
  Top Layer w0.1: v1(29.22,28.065) D1.L7.N7@29.62,27.665 ; v1(43.42,32.16) D1.L2.E4@43.82,31.76
  Middle Layer 1 w0.1: v1(29.22,28.065) 29.652,28.065 ccw(c29.652,28.458) 29.93,28.18 30.968,29.218 cw(c31.77,28.415) 31.77,29.55 33.285,29.55 ccw(c33.285,30.165) 33.316,29.551 ccw(c33.285,30.165) 33.72,29.73 33.853,29.863 cw(c34.648,29.068) 34.387,30.162 cw(c34.648,29.068) 34.437,30.173 34.456,30.174 ccw(c34.437,30.373) 34.637,30.373 34.637,30.415 cw(c34.837,30.415) 35.037,30.415 35.037,30.279 ccw(c35.237,30.279) 35.437,30.279 35.437,30.415 cw(c35.637,30.415) 35.837,30.415 35.837,30.279 ccw(c36.037,30.279) 36.237,30.279 36.237,30.415 cw(c36.437,30.415) 36.637,30.415 36.637,30.279 ccw(c36.837,30.279) 37.037,30.279 37.037,30.415 cw(c37.237,30.415) 37.437,30.415 37.437,30.279 ccw(c37.637,30.279) 37.837,30.279 37.837,30.397 cw(c38.037,30.397) 38.237,30.397 38.237,30.393 ccw(c38.437,30.393) 38.437,30.193 38.775,30.193 cw(c38.775,29.951) 38.786,30.192 cw(c38.775,29.951) 39.017,29.951 39.017,29.271 ccw(c39.262,29.271) 39.262,29.025 ccw(c39.262,29.271) 39.508,29.271 39.508,30.16 cw(c39.753,30.16) 39.753,30.406 cw(c39.753,30.16) 39.999,30.16 39.999,29.551 ccw(c40.244,29.551) 40.244,29.305 ccw(c40.244,29.551) 40.49,29.551 40.49,30.44 cw(c40.736,30.44) 40.736,30.686 cw(c40.736,30.44) 40.981,30.44 40.981,30.402 ccw(c41.234,30.402) 41.234,30.149 43.566,30.149 ccw(c43.566,30.381) 43.73,30.217 ccw(c43.49,30.458) 43.83,30.458 43.83,31.527 ccw(c43.292,31.527) 43.673,31.907 v1(43.42,32.16)
ADDR13: D1.L2.D4 D1.L7.T3 | length 26.4
  Top Layer w0.1: v1(26.02,25.665) D1.L7.T3@26.42,25.265 ; v1(43.42,32.96) D1.L2.D4@43.82,32.56
  Middle Layer 1 w0.1: v1@25.988,25.742 25.78,25.95 cw(c26.263,26.433) 25.58,26.433 25.58,28.142 cw(c25.865,28.142) 25.664,28.344 25.69,28.37 cw(c25.907,28.153) 25.907,28.46 26.498,28.46 ccw(c26.498,28.995) 26.877,28.617 27.734,29.474 27.77,29.51 28.335,30.075 ccw(c28.194,30.217) 28.335,30.358 28.1,30.593 cw(c28.241,30.735) 28.1,30.876 cw(c28.241,30.735) 28.383,30.876 28.709,30.55 ccw(c28.851,30.691) 28.992,30.55 ccw(c28.851,30.691) 28.992,30.833 28.805,31.02 cw(c28.947,31.161) 28.805,31.303 cw(c28.947,31.161) 29.088,31.303 29.184,31.207 ccw(c29.325,31.348) 29.467,31.207 29.64,31.38 29.667,31.407 cw(c30.266,30.807) 29.676,31.416 cw(c30.266,30.807) 29.681,31.42 cw(c30.266,30.807) 30.266,31.655 31.749,31.655 ccw(c31.749,32.218) 32.147,31.82 33.799,33.472 cw(c35.235,32.036) 35.235,34.067 39.741,34.067 cw(c39.741,33.64) 40.043,33.942 ; v1@25.988,25.742 cw(c25.911,25.665) v1(26.02,25.665) ; 40.043,33.942 40.479,33.506 ccw(c40.848,33.875) 40.848,33.353 42.915,33.353 cw(c42.915,33.083) 43.106,33.274 v1(43.42,32.96)
ADDR14: D1.L2.F4 D1.L7.T7 | length 26.5
  Top Layer w0.1: v1(29.22,25.665) D1.L7.T7@29.62,25.265 ; v1(43.42,31.36) D1.L2.F4@43.82,30.96
  Middle Layer 1 w0.1: v1@29.19,25.665 28.931,25.924 cw(c29.962,26.955) 28.504,26.955 28.504,27.783 28.504,28.155 cw(c28.94,28.155) 28.631,28.464 29.796,29.628 ccw(c29.207,30.217) 30.04,30.217 cw(c30.702,30.217) 30.234,30.686 30.498,30.95 cw(c30.924,30.524) 30.924,31.127 32.249,31.127 ccw(c32.249,32.01) 32.873,31.385 cw(c33.465,30.793) 33.465,31.63 33.682,31.63 33.732,31.63 ccw(c33.732,31.83) 33.932,31.83 33.932,32.412 cw(c34.132,32.412) 34.332,32.412 34.332,31.394 ccw(c34.532,31.394) 34.732,31.394 34.732,32.412 cw(c34.932,32.412) 35.132,32.412 35.132,31.772 ccw(c35.332,31.772) 35.532,31.772 35.532,32.38 cw(c35.732,32.38) 35.932,32.38 35.932,31.83 ccw(c36.132,31.83) 36.132,31.63 36.418,31.63 39.249,31.63 ccw(c39.249,31.807) 39.374,31.682 cw(c39.545,31.511) 39.545,31.753 42.888,31.753 cw(c42.888,31.417) 43.125,31.655 v1(43.42,31.36)
BA0: D1.L2.L16 D1.L9.M2 | length 37.2
  Top Layer w0.1: D1.L2.L16@53.42,26.96 v1(53.82,26.56) ; v1(80.08,39.445) D1.L9.M2@80.48,39.045
  Middle Layer 3 w0.1: v1(53.82,26.56) 54.253,26.993 cw(c54.785,26.461) 54.785,27.213 57.648,27.213 ccw(c57.648,27.627) 57.94,27.334 67.779,37.173 cw(c68.414,36.538) 68.414,37.437 72.69,37.437 72.74,37.437 ccw(c72.74,37.637) 72.94,37.637 72.94,37.702 cw(c73.14,37.702) 73.34,37.702 73.34,37.063 ccw(c73.54,37.063) 73.74,37.063 73.74,37.702 cw(c73.94,37.702) 74.14,37.702 74.14,37.153 ccw(c74.34,37.153) 74.54,37.153 74.54,37.637 cw(c74.74,37.637) 74.94,37.637 ccw(c75.14,37.637) 75.14,37.437 75.944,37.437 79.279,37.437 ; 79.28,37.437 ccw(c79.28,38.143) 79.779,37.643 ccw(c79.053,38.369) 80.08,38.369 v1(80.08,39.445)
BA1: D1.L2.J19 D1.L9.N8 | length 37.2
  Top Layer w0.1: D1.L2.J19@55.82,28.56 v1(56.22,28.96) ; D1.L9.N8@75.68,39.845 v1(76.08,40.245)
  Middle Layer 3 w0.1: v1(56.22,28.96) 56.542,28.638 ccw(c56.75,28.846) 56.75,28.552 57.071,28.552 ; 57.072,28.552 ccw(c57.072,29.011) 57.397,28.686 59.581,30.87 59.616,30.906 ccw(c59.475,31.047) 59.616,31.188 59.607,31.197 cw(c59.749,31.338) 59.607,31.48 cw(c59.749,31.338) 59.89,31.48 60.078,31.292 ccw(c60.22,31.433) 60.361,31.292 ccw(c60.22,31.433) 60.361,31.574 60.173,31.763 cw(c60.314,31.904) 60.173,32.046 cw(c60.314,31.904) 60.456,32.046 60.644,31.857 ccw(c60.786,31.999) 60.927,31.857 ccw(c60.786,31.999) 60.927,32.14 60.739,32.328 cw(c60.88,32.47) 60.739,32.611 cw(c60.88,32.47) 61.022,32.611 61.21,32.423 ccw(c61.351,32.564) 61.493,32.423 ccw(c61.351,32.564) 61.493,32.706 61.304,32.894 cw(c61.446,33.035) 61.304,33.177 cw(c61.446,33.035) 61.587,33.177 61.776,32.989 ccw(c61.917,33.13) 62.058,32.989 ccw(c61.917,33.13) 62.058,33.271 61.87,33.46 cw(c62.011,33.601) 61.87,33.743 cw(c62.011,33.601) 62.153,33.743 62.341,33.554 ccw(c62.483,33.696) 62.624,33.554 ccw(c62.483,33.696) 62.624,33.837 62.436,34.025 cw(c62.577,34.167) 62.436,34.308 cw(c62.577,34.167) 62.719,34.308 62.907,34.12 ccw(c63.048,34.261) 63.19,34.12 ccw(c63.048,34.261) 63.19,34.403 63.001,34.591 cw(c63.143,34.733) 63.001,34.874 cw(c63.143,34.733) 63.284,34.874 63.473,34.686 ccw(c63.614,34.827) 63.755,34.686 ccw(c63.614,34.827) 63.755,34.968 63.567,35.157 cw(c63.709,35.298) 63.567,35.44 cw(c63.709,35.298) 63.85,35.44 64.038,35.251 ccw(c64.18,35.393) 64.321,35.251 ccw(c64.18,35.393) 64.321,35.534 64.133,35.722 cw(c64.274,35.864) 64.133,36.005 cw(c64.274,35.864) 64.416,36.005 64.604,35.817 ccw(c64.745,35.958) 64.887,35.817 ccw(c64.745,35.958) 64.887,36.1 64.698,36.288 cw(c64.84,36.43) 64.698,36.571 cw(c64.84,36.43) 64.981,36.571 65.17,36.383 ccw(c65.311,36.524) 65.452,36.383 ccw(c65.311,36.524) 65.452,36.666 65.264,36.854 cw(c65.406,36.995) 65.264,37.137 cw(c65.406,36.995) 65.547,37.137 65.711,36.973 ccw(c65.852,37.114) 65.994,36.973 ccw(c65.852,37.114) 65.994,37.256 65.838,37.411 cw(c65.98,37.552) 65.838,37.694 cw(c65.98,37.552) 66.121,37.694 ccw(c66.263,37.835) 66.404,37.694 67.373,38.663 68.414,39.704 cw(c68.757,39.362) 68.757,39.846 ; 68.758,39.846 75.385,39.846 ccw(c75.385,40.561) 75.89,40.055 v1(76.08,40.245)
BA2: D1.L2.K19 D1.L9.M3 | length 37.2
  Top Layer w0.1: D1.L2.K19@55.82,27.76 v1(56.22,28.16) ; v1(79.28,39.445) D1.L9.M3@79.68,39.045
  Middle Layer 3 w0.1: v1(56.22,28.16) 55.921,28.459 cw(c56.184,28.721) 55.813,28.721 55.813,29.046 cw(c56.098,29.046) 55.896,29.247 cw(c56.138,29.005) 56.138,29.348 56.652,29.348 ccw(c56.652,30.279) 57.31,29.62 67.952,40.262 cw(c68.851,39.365) 68.851,40.635 69.659,40.635 69.709,40.635 ccw(c69.709,40.835) 69.909,40.835 69.909,41.007 cw(c70.109,41.007) 70.309,41.007 70.309,40.304 ccw(c70.509,40.304) 70.709,40.304 70.709,41.007 cw(c70.909,41.007) 71.109,41.007 71.109,40.304 ccw(c71.309,40.304) 71.509,40.304 71.509,41.007 cw(c71.709,41.007) 71.909,41.007 71.909,40.304 ccw(c72.109,40.304) 72.309,40.304 72.309,40.98 cw(c72.509,40.98) 72.709,40.98 72.709,40.835 ccw(c72.909,40.835) 72.909,40.635 74.746,40.635 77.86,40.635 cw(c77.861,40.082) 78.252,40.473 78.253,40.472 v1(79.28,39.445)
BA_M0: D1.L2.L5 D1.L7.M2 | length 25.7
  Top Layer w0.1: v1(25.22,28.865) D1.L7.M2@25.62,28.465 ; v1(44.22,26.56) D1.L2.L5@44.62,26.96
  Middle Layer 3 w0.1: v1(25.22,28.865) ccw(c24.242,29.843) 25.625,29.843 25.625,30.477 cw(c26.027,30.477) 25.742,30.76 cw(c26.002,30.501) 26.002,30.868 32.94,30.868 cw(c32.94,30.519) 33.186,30.766 33.365,30.587 33.683,30.269 cw(c33.542,30.128) 33.683,29.986 33.422,29.725 ccw(c33.563,29.583) 33.422,29.442 ccw(c33.563,29.583) 33.705,29.442 34.025,29.762 cw(c34.166,29.621) 34.308,29.762 cw(c34.166,29.621) 34.308,29.479 34.134,29.306 ccw(c34.275,29.164) 34.134,29.023 ccw(c34.275,29.164) 34.417,29.023 34.532,29.138 cw(c34.673,28.996) 34.815,29.138 35.418,28.535 36.025,27.927 36.026,27.926 ccw(c36.428,28.327) 36.428,27.76 ; 36.429,27.76 43.118,27.76 cw(c43.118,27.224) 43.497,27.603 43.966,27.134 43.968,27.132 cw(c43.402,26.568) 44.201,26.568 v1(44.22,26.56)
BA_M1: D1.L2.R4 D1.L7.N8 | length 25.7
  Top Layer w0.1: D1.L7.N8@30.42,27.665 v1(30.82,28.065) ; v1(43.42,23.36) D1.L2.R4@43.82,23.76
  Middle Layer 3 w0.1: 29.37,26.879 cw(c29.37,27.358) 29.032,27.019 29.03,27.02 cw(c29.334,27.322) 28.906,27.322 cw(c29.247,27.321) 29.006,27.563 cw(c29.264,27.304) 29.264,27.67 30.206,27.67 ccw(c30.206,28.114) 30.52,27.8 30.76,28.04 cw(c30.82,27.981) v1(30.82,28.065) ; 29.371,26.879 31.793,26.879 cw(c31.793,25.856) 32.517,26.579 32.659,26.438 ccw(c33.289,27.068) 33.289,26.177 33.468,26.177 33.518,26.177 33.918,26.177 cw(c33.918,25.977) 34.118,25.977 34.118,25.825 ccw(c34.318,25.825) 34.518,25.825 34.518,26.015 cw(c34.718,26.015) 34.918,26.015 34.918,25.825 ccw(c35.118,25.825) 35.318,25.825 35.318,26.015 cw(c35.518,26.015) 35.718,26.015 35.718,25.825 ccw(c35.918,25.825) 36.118,25.825 36.118,26.015 cw(c36.318,26.015) 36.518,26.015 36.518,25.825 ccw(c36.718,25.825) 36.918,25.825 36.918,26.015 cw(c37.118,26.015) 37.318,26.015 37.318,25.825 ccw(c37.518,25.825) 37.718,25.825 37.718,26.015 cw(c37.918,26.015) 38.118,26.015 38.118,25.825 ccw(c38.318,25.825) 38.518,25.825 38.518,26.015 cw(c38.718,26.015) 38.918,26.015 38.918,25.97 ccw(c39.118,25.97) 39.318,25.97 39.318,25.977 cw(c39.518,25.977) 39.518,26.177 40.283,26.177 40.468,26.128 cw(c40.283,25.799) 40.518,26.094 cw(c40.283,25.799) 40.549,26.066 41.334,25.281 cw(c41.103,25.05) 41.43,25.05 41.43,24.073 ccw(c42.01,24.073) 41.6,23.663 ccw(c42.331,24.393) 42.331,23.36 42.577,23.36 ; 42.578,23.36 v1(43.42,23.36)
BA_M2: D1.L2.J5 D1.L7.M3 | length 25.7
  Top Layer w0.1: v1(26.02,28.865) D1.L7.M3@26.42,28.465 ; v1(44.22,28.96) D1.L2.J5@44.62,28.56
  Middle Layer 3 w0.1: 24.816,28.578 ccw(c25.184,28.578) 25.459,28.334 25.99,28.865 v1(26.02,28.865) ; 24.816,28.579 24.816,30.528 cw(c25.384,30.528) 24.982,30.929 cw(c25.552,30.36) 25.552,31.166 33.156,31.166 cw(c33.157,30.643) 33.527,31.013 33.528,31.012 35.796,28.744 ccw(c36.26,29.208) 36.26,28.552 43.725,28.552 ccw(c43.725,28.76) 43.873,28.613 v1(44.22,28.96)
CFGBVS_0: D1.L2.M6 R39.L2.2 | length 8.8
  Top Layer w0.2: v1(45.02,25.76) D1.L2.M6@45.42,26.16
  Bottom Layer w0.1: v1(38.58,23.34) 38.595,23.34 39.038,23.782 44.429,23.782 44.62,23.973 44.62,25.1 45.003,25.483 45.003,25.743 v1(45.02,25.76)
CKE: D1.L2.F20 D1.L9.K9 | length 36.5
  Top Layer w0.1: D1.L2.F20@56.62,30.96 v1(57.02,31.36) ; v1(73.22,32.175) ccw(c71.771,33.624) 73.82,33.624 73.82,35.85 cw(c75.112,35.85) 74.198,36.763 D1.L9.K9@74.88,37.445 D1.L9.K9@74.815,37.445
  Bottom Layer w0.1: v1(57.02,31.36) 61.865,31.36 61.915,31.36 ccw(c61.915,31.56) 62.115,31.56 62.115,31.819 cw(c62.315,31.819) 62.515,31.819 62.515,30.914 ccw(c62.715,30.914) 62.915,30.914 62.915,31.819 cw(c63.115,31.819) 63.315,31.819 63.315,30.914 ccw(c63.515,30.914) 63.715,30.914 63.715,31.819 cw(c63.915,31.819) 64.115,31.819 64.115,30.914 ccw(c64.315,30.914) 64.515,30.914 64.515,31.819 cw(c64.715,31.819) 64.915,31.819 64.915,30.914 ccw(c65.115,30.914) 65.315,30.914 65.315,31.819 cw(c65.515,31.819) 65.715,31.819 65.715,30.914 ccw(c65.915,30.914) 66.115,30.914 66.115,31.819 cw(c66.315,31.819) 66.515,31.819 66.515,31.135 ccw(c66.715,31.135) 66.915,31.135 66.915,31.56 cw(c67.115,31.56) 67.315,31.56 ccw(c67.515,31.56) 67.515,31.36 67.88,31.36 71.353,31.36 ccw(c71.353,33.9) 73.149,32.104 v1(73.22,32.175)
CKE_M: D1.L2.N3 D1.L7.K9 | length 24.9
  Top Layer w0.1: D1.L7.K9@31.22,30.065 31.683,30.065 31.733,30.065 ccw(c31.733,30.265) 31.933,30.265 31.933,30.924 cw(c32.133,30.924) 32.333,30.924 32.333,29.465 ccw(c32.533,29.465) 32.733,29.465 32.733,30.924 cw(c32.933,30.924) 33.133,30.924 33.133,29.465 ccw(c33.333,29.465) 33.533,29.465 33.533,30.868 cw(c33.733,30.868) 33.933,30.868 33.933,30.265 ccw(c34.133,30.265) 34.133,30.065 34.377,30.065 34.427,30.065 34.844,30.065 cw(c34.844,28.699) 34.957,30.06 cw(c34.844,28.699) v1(35.81,29.665) ; v1(42.62,24.96) D1.L2.N3@43.02,25.36
  Top Layer w0.2: D1.L7.K9@31.205,30.05 D1.L7.K9@31.22,30.065
  Bottom Layer w0.1: v1(35.81,29.665) 36.817,28.658 36.818,28.657 ccw(c37.074,28.913) 37.074,28.551 ; 37.075,28.551 42.679,28.551 ; v1(42.62,24.96) 42.88,25.22 ccw(c42.539,25.56) 43.021,25.56 43.021,28.26 43.021,28.27 ccw(c42.68,28.204) 42.68,28.551
CLK_M_N: D1.L2.M2 D1.L7.K7 R1.L7.1 | length 24.4
  Top Layer w0.1: v1@28.355,29.001 cw(c28.488,29.134) 28.3,29.134 28.3,29.703 cw(c28.812,29.703) 28.45,30.066 cw(c29.052,29.463) 29.052,30.315 29.116,30.315 cw(c29.116,29.461) D1.L7.K7@29.719,30.066 ; D1.L2.M2@42.22,26.16 v1(42.62,26.56)
  Bottom Layer w0.1: v1(28.41,28.865) 28.41,28.862 cw(c28.222,28.862) 28.355,28.729 ccw(c28.488,28.596) 28.3,28.596 28.3,28.54 28.3,27.8 ccw(c28.475,27.8) 28.475,27.625 28.479,27.625 cw(c28.479,27.45) 28.654,27.45 cw(c28.479,27.45) 28.479,27.275 28.475,27.275 ccw(c28.475,27.1) 28.3,27.1 28.3,26.7 28.3,26.495 ccw(c30.485,26.495) 28.94,24.95 29.064,24.826 ccw(c30.86,26.622) 30.589,24.097 ccw(c30.86,26.622) 30.86,24.082 32.244,24.082 32.3,24.082 ccw(c32.3,24.692) 32.41,24.092 ccw(c32.3,24.692) R1.L7.1@32.91,24.692 ; R1.L7.1@33.56,24.692 ccw(c34.183,24.692) 34.183,24.069 34.882,24.069 ccw(c34.882,25.438) 35.85,24.47 36.526,25.146 36.667,25.287 ; 36.668,25.288 ccw(c36.526,25.429) 36.667,25.571 36.568,25.67 cw(c36.921,26.024) 37.275,26.377 37.374,26.278 ccw(c37.516,26.419) 37.658,26.278 37.978,26.598 ; 37.978,26.598 38.119,26.739 38.179,26.799 cw(c40.028,24.95) 40.028,27.565 41.404,27.565 cw(c41.404,26.577) 42.102,27.276 42.264,27.114 cw(c42.08,26.93) 42.34,26.93 42.34,26.799 ccw(c42.477,26.799) 42.38,26.702 v1@42.509,26.574 ; v1@42.509,26.56 v1@42.59,26.56
CLK_M_P: D1.L2.L2 D1.L7.J7 R1.L7.2 | length 24.5
  Top Layer w0.1: v1@27.945,29.001 ccw(c27.812,29.134) 28,29.134 28,29.705 cw(c28.809,29.705) 28.237,30.277 28.24,30.28 cw(c29.049,29.47) 29.049,30.615 29.116,30.615 ccw(c29.116,31.469) D1.L7.J7@29.719,30.864 ; D1.L7.J7@29.62,30.865 ccw(c29.016,31.469) D1.L7.J7@29.62,30.865 ; v1(41.82,26.56) D1.L2.L2@42.22,26.96
  Bottom Layer w0.1: v1(27.89,28.865) 27.89,28.862 ccw(c28.078,28.862) 27.945,28.729 cw(c27.812,28.596) 28,28.596 28,26.494 ccw(c30.481,26.494) 28.727,24.739 ; 28.727,24.739 28.854,24.612 ccw(c30.857,26.616) 30.857,23.782 32.3,23.782 cw(c32.3,23.172) R1.L7.2@32.91,23.172 ; R1.L7.2@33.56,23.172 cw(c34.156,23.172) 34.156,23.769 34.885,23.769 ccw(c34.885,25.43) 36.06,24.255 36.738,24.934 36.879,25.075 ccw(c36.526,25.429) 36.879,25.783 36.781,25.881 ; 36.78,25.882 cw(c36.921,26.024) 37.063,26.165 37.162,26.066 ccw(c37.516,26.419) 37.87,26.066 38.19,26.386 ; 38.19,26.386 38.332,26.527 38.39,26.586 cw(c40.029,24.947) 40.029,27.265 41.389,27.265 cw(c41.389,26.541) 41.9,27.053 42.009,26.945 cw(c41.934,26.87) 42.04,26.87 42.04,26.797 cw(c41.903,26.797) 42,26.7 41.871,26.571 41.871,26.56 v1(41.82,26.56)
CLK_N: D1.L2.D18 D1.L9.K7 R1.L9.1 | length 36
  Top Layer w0.1: D1.L2.D18@55.02,32.563 v1(55.42,32.163) ; D1.L9.K7@76.48,37.445 ccw(c77.084,38.049) 77.084,37.195 77.112,37.195 cw(c77.112,36.556) 77.564,37.008 77.566,37.005 cw(c76.877,36.315) 77.852,36.315 77.852,34.594 ccw(c78.04,34.594) v1@77.907,34.461
  Bottom Layer w0.1: v1@55.306,32.096 cw(c55.66,32.45) 55.16,32.45 cw(c55.533,32.45) 55.268,32.713 55.268,32.716 cw(c55.732,32.253) 55.732,32.908 61.193,32.908 61.393,32.908 ccw(c61.393,33.408) 61.893,33.408 61.893,33.592 cw(c62.093,33.592) 62.293,33.592 62.293,32.953 ccw(c62.793,32.953) 63.293,32.953 63.293,33.592 cw(c63.493,33.592) 63.693,33.592 63.693,32.953 ccw(c64.193,32.953) 64.693,32.953 64.693,33.592 cw(c64.893,33.592) 65.093,33.592 65.093,32.953 ccw(c65.593,32.953) 66.093,32.953 66.093,33.418 cw(c66.293,33.418) 66.493,33.418 66.493,33.408 ccw(c66.993,33.408) 66.993,32.908 68.445,32.908 68.68,32.908 cw(c68.68,32.298) R1.L9.1@69.29,32.298 ; v1@55.316,32.206 55.317,32.205 ccw(c55.42,32.307) v1(55.42,32.163) ; R1.L9.1@69.915,32.314 cw(c70.512,32.314) 70.512,32.911 76.733,32.911 ccw(c76.733,34.123) 77.59,33.266 77.627,33.302 ccw(c77.082,33.847) 77.852,33.847 77.852,34.056 cw(c78.04,34.056) 77.907,34.189 ccw(c77.774,34.322) 77.962,34.322 v1(77.962,34.325)
CLK_P: D1.L2.E17 D1.L9.J7 R1.L9.2 | length 35.8
  Top Layer w0.1: D1.L2.E17@54.22,31.76 v1(54.62,32.16) ; D1.L9.J7@76.48,36.645 cw(c77.084,36.041) 77.084,36.895 77.111,36.895 cw(c77.111,36.554) 77.352,36.795 cw(c76.869,36.312) 77.552,36.312 77.552,34.594 cw(c77.364,34.594) v1@77.497,34.461
  Bottom Layer w0.1: v1@54.713,32.096 ccw(c54.36,32.45) 54.86,32.45 cw(c55.547,32.45) 55.061,32.935 55.063,32.935 cw(c55.722,32.277) 55.722,33.208 61.193,33.208 61.393,33.208 ccw(c61.393,33.408) 61.593,33.408 61.593,33.592 cw(c62.093,33.592) 62.593,33.592 62.593,32.953 ccw(c62.793,32.953) 62.993,32.953 62.993,33.592 cw(c63.493,33.592) 63.993,33.592 63.993,32.953 ccw(c64.193,32.953) 64.393,32.953 64.393,33.592 cw(c64.893,33.592) 65.393,33.592 65.393,32.953 ccw(c65.593,32.953) 65.793,32.953 65.793,33.418 cw(c66.293,33.418) 66.793,33.418 66.793,33.408 ccw(c66.993,33.408) 66.993,33.208 68.445,33.208 68.68,33.208 ccw(c68.68,33.818) 68.79,33.218 ccw(c68.68,33.818) R1.L9.2@69.29,33.818 ; R1.L9.2@69.915,33.834 ccw(c70.539,33.834) 70.539,33.211 72.12,33.211 72.17,33.211 ccw(c72.17,33.411) 72.37,33.411 72.37,33.416 cw(c72.57,33.416) 72.77,33.416 72.77,33.411 ccw(c72.97,33.411) 72.97,33.211 73.62,33.211 76.73,33.211 ccw(c76.73,34.13) 77.38,33.48 77.412,33.512 ccw(c77.074,33.85) 77.552,33.85 77.552,34.056 ccw(c77.364,34.056) 77.497,34.189 cw(c77.63,34.322) 77.442,34.322 v1(77.442,34.325)
DI1: R9.L2.1 X8.L1.24 | length 8.5
  Bottom Layer w0.2: R9.L2.1@94.76,36.2 97.64,36.2 98.074,36.634 98.074,40.209 X8.L1.24@99.065,41.2
DI2: R10.L2.1 X8.L1.26 | length 11.7
  Bottom Layer w0.2: R10.L2.1@94.63,33.95 R10.L2.1@94.826,34.146 ; R10.L2.1@94.788,33.706 95.634,32.86 98.38,32.86 100.142,34.622 100.142,38.123 X8.L1.26@99.065,39.2
DO1: R3.L2.1 X8.L1.17 | length 2.4
  Bottom Layer w0.3: R3.L2.1@94.63,47.2 X8.L1.17@97.065,47.2
DO2: R5.L2.1 X8.L1.19 | length 2.4
  Bottom Layer w0.3: R5.L2.1@94.63,45.2 X8.L1.19@97.065,45.2
DO3: R44.L2.1 X8.L1.21 | length 2.4
  Bottom Layer w0.3: R44.L2.1@94.63,43.2 X8.L1.21@97.065,43.2
DO4: R46.L2.1 X8.L1.23 | length 2.5
  Bottom Layer w0.3: R46.L2.1@94.63,41.26 94.69,41.2 X8.L1.23@97.065,41.2
DONE_0: D1.L2.R11 R31.L2.2 VD3.L2.1 | length 9.5
  Top Layer w0.1: VD3.L2.1@51.24,17.02 v1(51.24,17.98)
  Top Layer w0.2: D1.L2.R11@49.42,23.76 v1(49.82,23.36)
  Top Layer w0.3: VD3.L2.1@51.12,16.9 R31.L2.2@52.99,16.9
  Bottom Layer w0.1: v1(49.82,23.36) 50.235,22.945 50.235,18.985 v1@51.34,17.88
DQ0: D1.L2.Y17 D1.L9.E3 R6.L8.2 | length 41.2
  Top Layer w0.1: D1.L2.Y17@54.22,19.76 v1(54.62,19.36) ; D1.L9.E3@79.68,33.445 v1(80.08,33.845)
  Middle Layer 2 w0.1: v1(54.62,19.36) 54.91,19.65 cw(c55.165,19.394) 55.165,19.755 57.211,19.755 ; 57.212,19.755 ccw(c57.212,20.078) 57.44,19.85 59.48,21.89 ccw(c57.599,23.772) 60.26,23.772 ; 60.26,23.773 60.26,23.82 cw(c62.551,23.82) 60.931,25.44 68.603,33.113 cw(c69.43,32.285) 69.43,33.455 76.183,33.455 ccw(c76.183,33.781) 76.414,33.551 ccw(c76.213,33.752) 76.498,33.752 76.498,33.95 cw(c76.867,33.95) 76.605,34.211 77.076,34.681 cw(c77.264,34.494) 77.264,34.76 ; 77.265,34.76 80.633,34.76 cw(c80.633,34.56) 80.832,34.56 cw(c80.633,34.56) 80.633,34.36 79.521,34.36 ccw(c79.521,34.161) 79.322,34.161 ccw(c79.521,34.161) 79.521,33.961 79.799,33.961 cw(c79.799,33.564) v1(80.08,33.845)
  Bottom Layer w0.1: v1(80.08,33.845) 80.322,34.087 cw(c80.753,33.655) 80.753,34.265 81.92,34.265 cw(c81.92,34.037) 82.082,34.198 ; 82.082,34.198 82.43,33.85 ccw(c82.579,33.999) 82.579,33.788 R6.L8.2@83.335,33.788
DQ0_M0_F: K2.L8.8 X8.L1.20 | length 65.3
  Middle Layer 2 w0.3: K2.L8.8@66.63,2.43 67.88,3.68 67.88,8.36 91.265,31.745 101.411,31.745 102.809,33.143 102.809,41.456 100.086,44.179 X8.L1.20@99.065,45.2